# Altium PCB DC-Motor-Driver-v1.0.PcbDoc (part 5 of 5)
Units mil, origin at the board's own origin, x right, y up, seen from the top; angles counter-clockwise.
Board outline 1968.5 x 1574.8 mil, 4 copper layers (Top Layer, Signal 1, Signal 2, Bottom Layer), stack 62.055 mil thick; 133 components, 124 nets, 619 pads, 342 vias.
Unrouted connection lines stored in the file: 5.
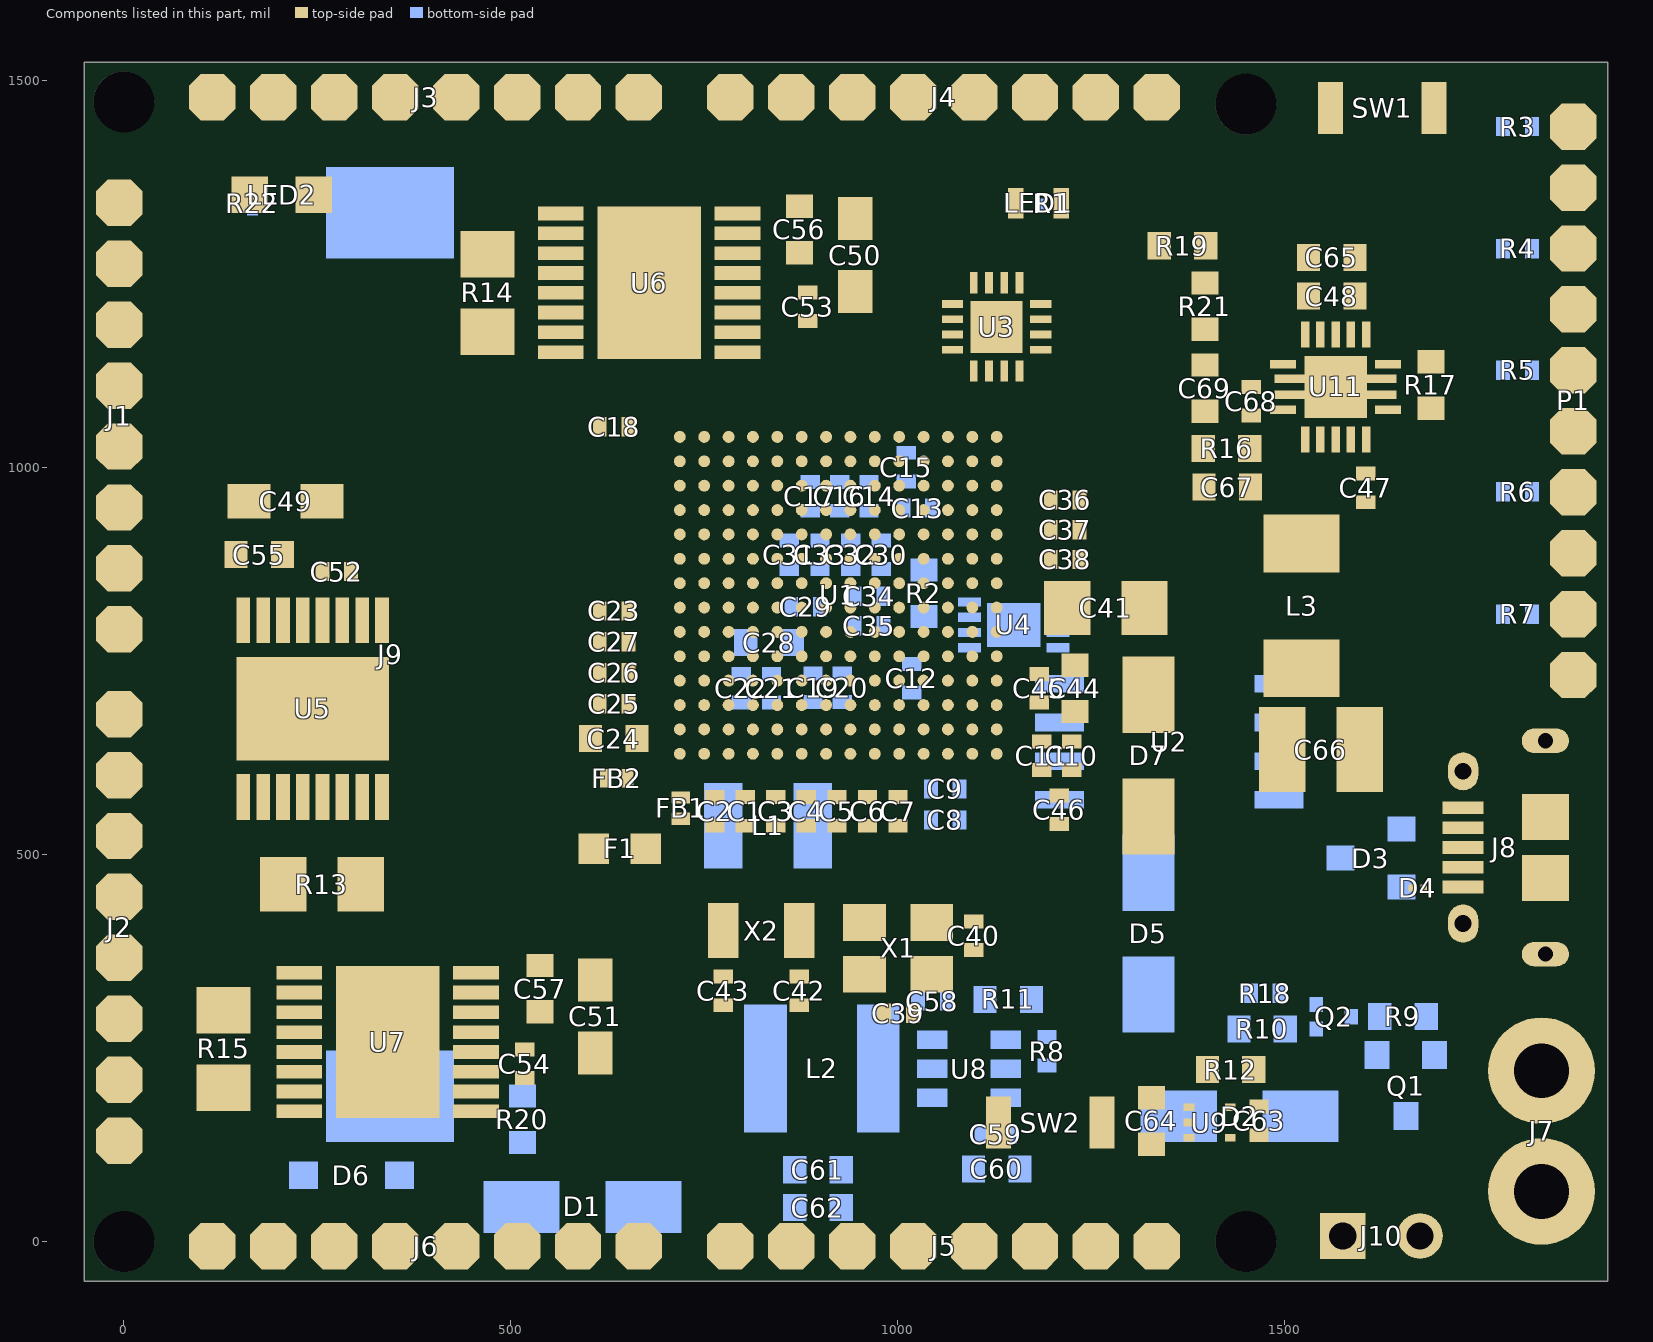
[diagram p5: the components of this part, seen from the top]

## Silkscreen, mask and mechanical layers (free items; w line width, h text height) (continued)
Drill Drawing:
  circle w10: c-51.92,2779.39 r33.33
  lines w10: -85.25,2162.73 -68.59,2162.73 -51.92,2146.06 -35.25,2162.73 -18.59,2162.73 -35.25,2179.39 -18.59,2196.06 -35.25,2196.06 -51.92,2212.72 -68.59,2196.06 -85.25,2196.06 -68.59,2179.39 -85.25,2162.73 ; -85.25,2296.06 -18.59,2296.06 -18.59,2362.72 -85.25,2362.72 -85.25,2296.06 ; -85.25,2479.39 -51.92,2446.06 -18.59,2479.39 -51.92,2512.72 -85.25,2479.39 ; -85.25,2662.72 -18.59,2662.72 -51.92,2596.06 -85.25,2662.72 ; -85.25,2896.06 -51.92,2912.73 -18.59,2896.06 -35.25,2929.39 -18.59,2962.72 -51.92,2946.06 -85.25,2962.72 -68.59,2929.39 -85.25,2896.06
  lines w15: -145.05,2101.06 9822.17,2101.06 ; -145.05,3001.06 9822.17,3001.06 ; 405.83,1951.06 405.83,3151.06 ; 1005.67,1951.06 1005.67,3151.06 ; 2105.35,1951.06 2105.35,3151.06 ; 2611.23,1951.06 2611.23,3151.06 ; 3345.03,1951.06 3345.03,3151.06 ; 4844.58,1951.06 4844.58,3151.06 ; 5434.43,1951.06 5434.43,3151.06 ; 6180.23,1951.06 6180.23,3151.06 ; 7319.89,1951.06 7319.89,3151.06 ; 8419.57,1951.06 8419.57,3151.06 ; -145.05,1951.06 9822.17,1951.06 9822.17,3151.06 -145.05,3151.06 -145.05,1951.06
  text "Symbol" at -55.05,3046.06 h72
  text "Count" at 450.83,3046.06 h72
  text "Hole Size" at 1050.67,3046.06 h72
  text "Plated" at 2150.35,3046.06 h72
  text "Hole Type" at 2656.23,3046.06 h72
  text "Drill Layer Pair" at 3390.03,3046.06 h72
  text "Via/Pad" at 4889.58,3046.06 h72
  text "Pad Shape" at 5479.43,3046.06 h72
  text "Template" at 6225.23,3046.06 h72
  text "Hole Length" at 7364.89,3046.06 h72
  text "Routed Path Length" at 8464.57,3046.06 h72
  text "342" at 450.83,2896.06 h60
  text "0.200mm (7.87mil)" at 1050.67,2896.06 h60
  text "PTH" at 2150.35,2896.06 h60
  text "Round" at 2656.23,2896.06 h60
  text "Top Layer - Bottom Layer" at 3390.03,2896.06 h60
  text "Via" at 4889.58,2896.06 h60
  text "Rounded" at 5479.43,2896.06 h60
  text "(Mixed)" at 6225.23,2896.06 h60
  text "-" at 7364.89,2896.06 h60
  text "-" at 8464.57,2896.06 h60
  text "2" at 450.83,2746.06 h60
  text "0.500mm (19.69mil)" at 1050.67,2746.06 h60
  text "PTH" at 2150.35,2746.06 h60
  text "Slot" at 2656.23,2746.06 h60
  text "Top Layer - Bottom Layer" at 3390.03,2746.06 h60
  text "Pad" at 4889.58,2746.06 h60
  text "Rounded" at 5479.43,2746.06 h60
  text "r80_155h50_115r100" at 6225.23,2746.06 h60
  text "1.150mm (45.28mil)" at 7364.89,2746.06 h60
  text "0.650mm (25.59mil)" at 8464.57,2746.06 h60
  text "2" at 450.83,2596.06 h60
  text "0.550mm (21.65mil)" at 1050.67,2596.06 h60
  text "PTH" at 2150.35,2596.06 h60
  text "Slot" at 2656.23,2596.06 h60
  text "Top Layer - Bottom Layer" at 3390.03,2596.06 h60
  text "Pad" at 4889.58,2596.06 h60
  text "Rounded" at 5479.43,2596.06 h60
  text "r100_125h55_85r100" at 6225.23,2596.06 h60
  text "0.850mm (33.47mil)" at 7364.89,2596.06 h60
  text "0.300mm (11.81mil)" at 8464.57,2596.06 h60
  text "2" at 450.83,2446.06 h60
  text "0.900mm (35.43mil)" at 1050.67,2446.06 h60
  text "PTH" at 2150.35,2446.06 h60
  text "Round" at 2656.23,2446.06 h60
  text "Top Layer - Bottom Layer" at 3390.03,2446.06 h60
  text "Pad" at 4889.58,2446.06 h60
  text "(Mixed)" at 5479.43,2446.06 h60
  text "(Mixed)" at 6225.23,2446.06 h60
  text "-" at 7364.89,2446.06 h60
  text "-" at 8464.57,2446.06 h60
  text "2" at 450.83,2296.06 h60
  text "1.800mm (70.87mil)" at 1050.67,2296.06 h60
  text "PTH" at 2150.35,2296.06 h60
  text "Round" at 2656.23,2296.06 h60
  text "Top Layer - Bottom Layer" at 3390.03,2296.06 h60
  text "Pad" at 4889.58,2296.06 h60
  text "Rounded" at 5479.43,2296.06 h60
  text "c350h180" at 6225.23,2296.06 h60
  text "-" at 7364.89,2296.06 h60
  text "-" at 8464.57,2296.06 h60
  text "4" at 450.83,2146.06 h60
  text "2.000mm (78.74mil)" at 1050.67,2146.06 h60
  text "NPTH" at 2150.35,2146.06 h60
  text "Round" at 2656.23,2146.06 h60
  text "Top Layer - Bottom Layer" at 3390.03,2146.06 h60
  text "Pad" at 4889.58,2146.06 h60
  text "Rounded" at 5479.43,2146.06 h60
  text "c200hn200" at 6225.23,2146.06 h60
  text "-" at 7364.89,2146.06 h60
  text "-" at 8464.57,2146.06 h60
  text "354 Total" at 450.83,1996.06 h60
  text "Slot definitions :" at -55.05,1851.08 h60
  text "Routed Path Length" at 977.64,1851.08 h60
  text "= Calculated from tool start centre position to tool end centre position." at 2080.31,1851.08 h60
  text "Hole Length" at 977.64,1751.11 h60
  text "= Routed Path Length + Tool Size = Slot length as defined in the PCB layout" at 1670.44,1751.11 h60

## Dimensions
-51,1524 to -51,-50.8 on Dimension
-51,1524 to 1917.5,1524 on Dimension

## Text inside footprints (layer, text, board x,y; h text height)
J8: Top Overlay "PCB Edge" at 1898.67,445.31 h31.5 r90